# Altium PCB PCB_Control_Board_v2.5.PcbDoc (part 2 of 2)
Units mil, origin at the board's own origin, x right, y up, seen from the top; angles counter-clockwise.
Board outline 1338.58 x 1496.06 mil, 4 copper layers (Top Layer, GND, POWER, Bottom Layer), stack 61.811 mil thick; 74 components, 46 nets, 202 pads, 134 vias.
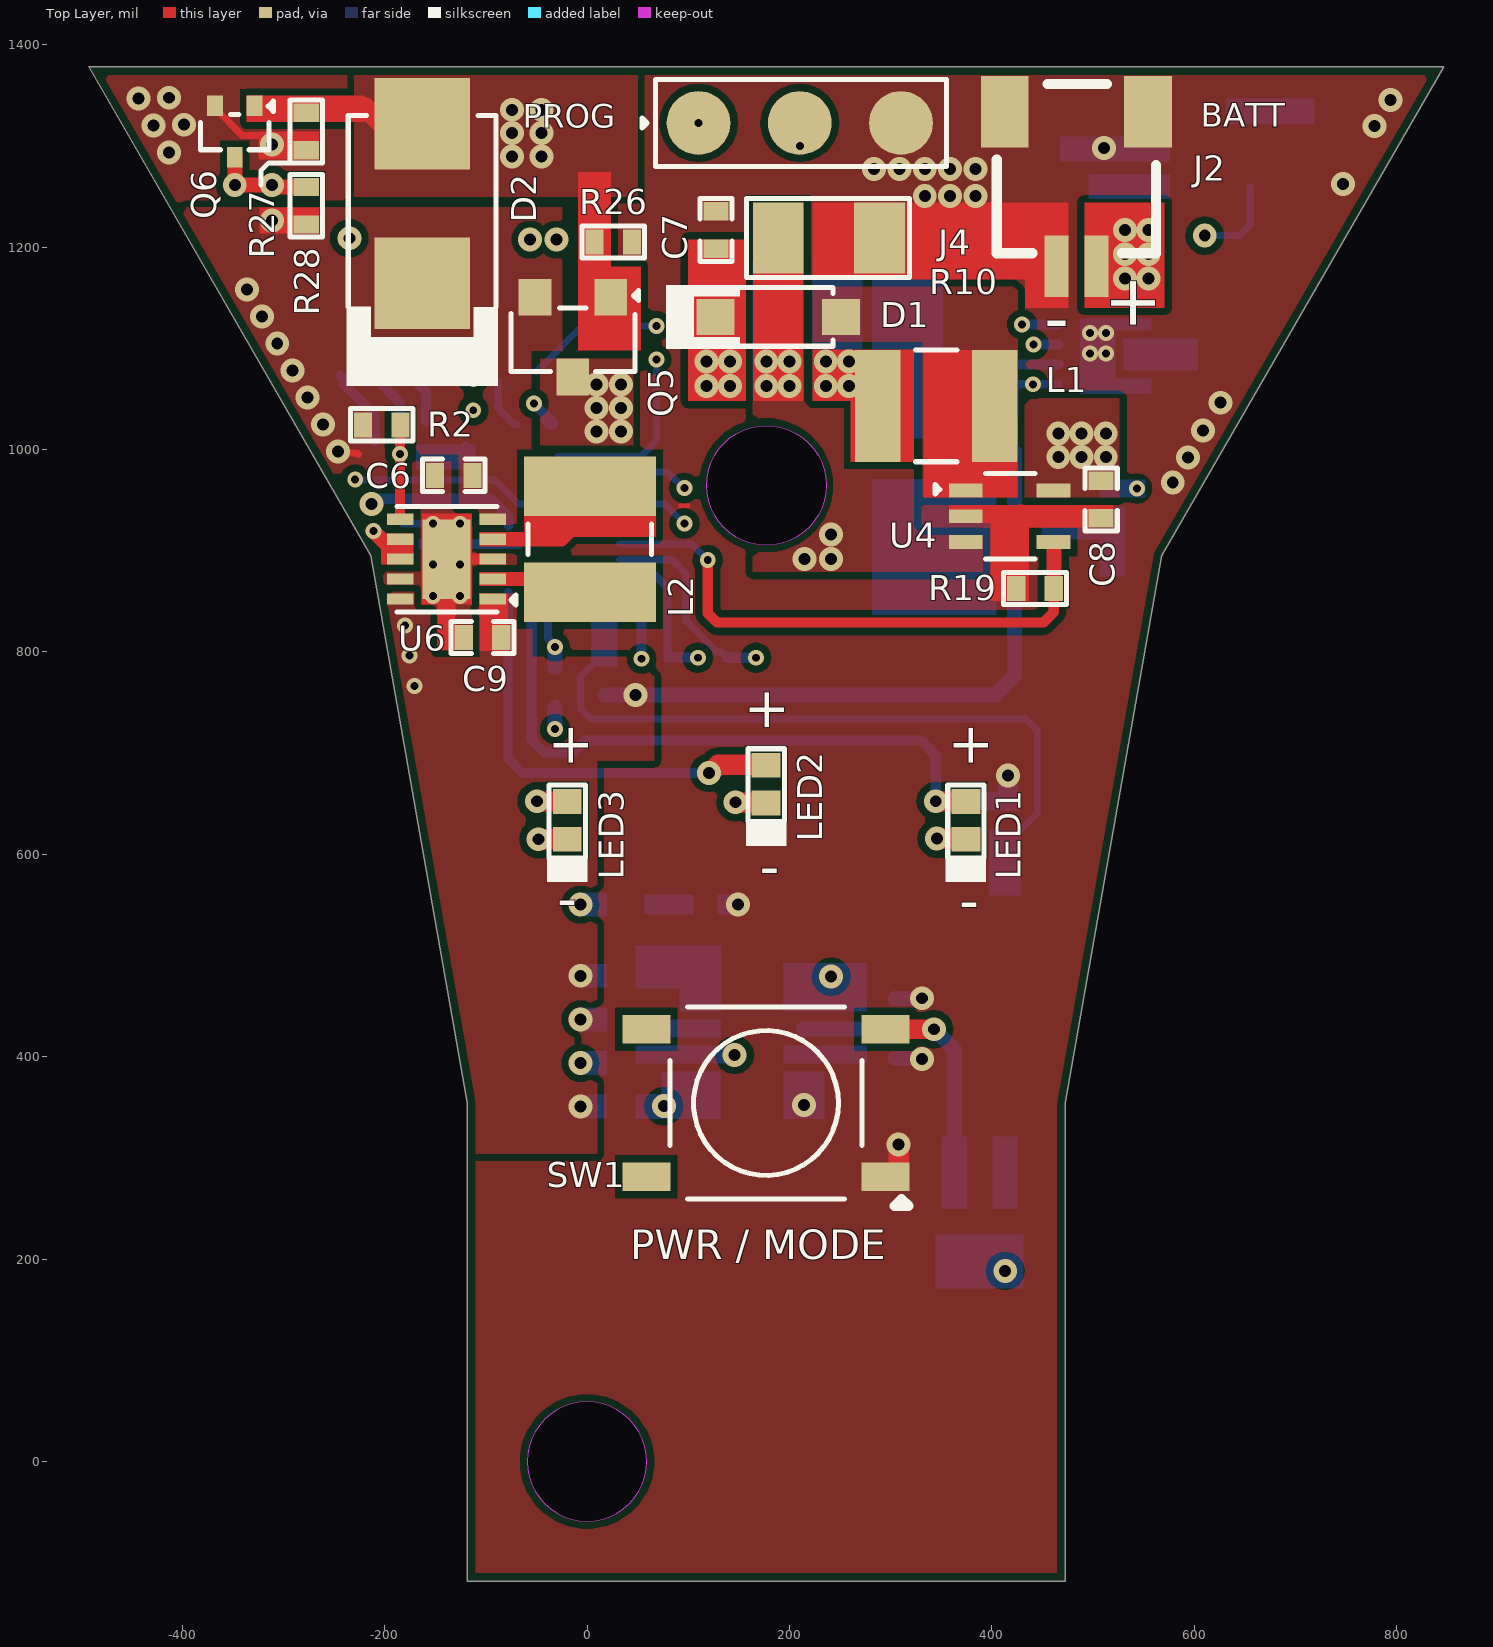
[diagram p0: Top Layer view]

## Part data (continued)
R21: library part RC0402FR-071KL, "RES 1K OHM 1% 1/16W 0402", Case Code (Imperial)=0402, Case Code (Metric)=1005, LCSC Part Number=C106235, Manufacturer=Yageo, Max Operating Temperature=155°C, Max Power Dissipation=63mW, Min Operating Temperature=-55°C, Power Rating=62.5mW, Resistance=1kR, Resistance Tolerance=1%, Resistor Type="Thick Film", Temperature Coefficient=100ppm/°C, Voltage Rating=50V, Case/Package=0402, Category="Chip SMD Resistors", ComponentLink1Description=https://datasheet.ciiva.com/11819/0900766b80c66297-11819477.pdf?src-supplier=RSComponents, ComponentLink1URL=https://datasheet.ciiva.com/11819/0900766b80c66297-11819477.pdf?src-supplier=RSComponents, ComponentLink2Description=https://datasheet.ciiva.com/7983/1018594-7983502.pdf?src-supplier=Element14, ComponentLink2URL=https://datasheet.ciiva.com/7983/1018594-7983502.pdf?src-supplier=Element14, ComponentLink3Description=https://datasheet.ciiva.com/22747/1018594-22747513.pdf?src-supplier=Element14, ComponentLink3URL=https://datasheet.ciiva.com/22747/1018594-22747513.pdf?src-supplier=Element14, ComponentLink4Description=https://datasheet.ciiva.com/12666/pyu-rc0402-51-rohs-l-6-r-12666741.pdf?src-supplier=Mouser, ComponentLink4URL=https://datasheet.ciiva.com/12666/pyu-rc0402-51-rohs-l-6-r-12666741.pdf?src-supplier=Mouser, ComponentLink5Description=https://datasheet.ciiva.com/7849/1018594-7849869.pdf?src-supplier=Element14, ComponentLink5URL=https://datasheet.ciiva.com/7849/1018594-7849869.pdf?src-supplier=Element14, ComponentLink6Description=https://datasheet.ciiva.com/7849/1018594-7849871.pdf?src-supplier=Element14, ComponentLink6URL=https://datasheet.ciiva.com/7849/1018594-7849871.pdf?src-supplier=Element14, ComponentLink7Description=https://datasheet.ciiva.com/17063/pyu-rc0402-51-rohs-l-6-r-17063193.pdf?src-supplier=Future+Electronics, ComponentLink7URL=https://datasheet.ciiva.com/17063/pyu-rc0402-51-rohs-l-6-r-17063193.pdf?src-supplier=Future+Electronics, Construction=Rectangular, Depth=0.5mm, Features="Moisture Resistant", Height=0.32mm, Item Type=Resistor, Lead Free="Lead Free", Length=1mm, Manufacturer Part Number=RC0402FR-071KL, Military Standard=Not, Number of Pins=2, Number of Terminations=2, Packaging="Tape and Reel", Pricing 1="10000=0.00085, 20000=0.00087, 40000=0.00084, 60000=0.00083, 80000=0.00079, 100000=0.00078, 1000000=0.00076 (USD)", Reach SVHC Compliant=Yes, RoHS=Yes, RoHS Compliant=Yes, Series=RC, Size Code=0402, Stock 1=13030000, Supplier 1=Avnet, Supplier Part Number 1=RC0402FR-071KL, Technology="THICK FILM", Termination=SMD/SMT, Tolerance=1%, Voltage Rating (DC)=50V, Width=0.5mm
R24 R25: library part RC0402FR-072K2L, "RES SMD 2.2K OHM 1% 1/16W 0402", Case Code (Imperial)=0402, Case Code (Metric)=1005, LCSC Part Number=C114762, Manufacturer=Yageo, Max Operating Temperature=155°C, Max Power Dissipation=63mW, Min Operating Temperature=-55°C, Resistance=2.2kR, Resistance Tolerance=1%, Resistor Type="Thick Film", Supplier Part Number 1=311-2.20KLRCT-ND, Temperature Coefficient=100ppm/°C, Voltage Rating=50V, Case/Package=0402, ComponentLink1Description=http://www.farnell.com/datasheets/2167052.pdf?src-supplier=Element14, ComponentLink1URL=http://www.farnell.com/datasheets/2167052.pdf?src-supplier=Element14, ComponentLink2Description=http://www.yageo.com/documents/recent/PYu-RC_Group_51_RoHS_L_9.pdf?src-supplier=Mouser, ComponentLink2URL=http://www.yageo.com/documents/recent/PYu-RC_Group_51_RoHS_L_9.pdf?src-supplier=Mouser, ComponentLink3Description=http://documents.rs-components.com/techlib://itc_doclist_GB.htm?stockno=6186532&src-supplier=RSComponents, ComponentLink3URL=http://documents.rs-components.com/techlib://itc_doclist_GB.htm?stockno=6186532&src-supplier=RSComponents, ComponentLink4Description=http://www.yageo.com/documents/recent/PYu-RC0402_51_RoHS_L_6_r.pdf?src-supplier=Future+Electronics, ComponentLink4URL=http://www.yageo.com/documents/recent/PYu-RC0402_51_RoHS_L_6_r.pdf?src-supplier=Future+Electronics, Construction=Rectangular, Depth=0.5mm, Features="Moisture Resistant", Height=0.35mm, Lead Free="Lead Free", Length=1mm, Manufacturer Part Number=RC0402FR-072K2L, Military Standard=Not, Number of Terminations=2, Packaging="Tape and Reel", Power Rating=63mW, Pricing 1="1=0.1, 10=0.016, 100=0.0066, 1000=0.00299, 2500=0.00259, 5000=0.00214 (USD)", REACH SVHC=Unknown, RoHS Compliant=Yes, Series=RC, Size Code=0402, Stock 1=966157, Supplier 1=Digi-Key, Technology="THICK FILM", Termination=SMD/SMT, Tolerance=1%, Weight=2.3E-05oz, Width=0.5mm
R27: library part RC0402FR-07100KL, "RES 100K OHM 1% 1/16W 0402", Case Code (Imperial)=0402, Case Code (Metric)=1005, LCSC Part Number=C60491, Manufacturer=Yageo, Max Operating Temperature=155°C, Max Power Dissipation=63mW, Min Operating Temperature=-55°C, Package Quantity=1, Resistance=100kR, Resistance Tolerance=1%, Resistor Type="Thick Film", Supplier Part Number 1=603-RC0402FR-07100KL, Temperature Coefficient=100ppm/°C, Voltage Rating=50V, Case/Package=0402, Category="Chip SMD Resistors", ComponentLink1Description=https://datasheet.ciiva.com/11819/0900766b80c66297-11819452.pdf?src-supplier=RSComponents, ComponentLink1URL=https://datasheet.ciiva.com/11819/0900766b80c66297-11819452.pdf?src-supplier=RSComponents, ComponentLink2Description=https://datasheet.ciiva.com/22747/1018594-22747509.pdf?src-supplier=Element14, ComponentLink2URL=https://datasheet.ciiva.com/22747/1018594-22747509.pdf?src-supplier=Element14, ComponentLink3Description=https://datasheet.ciiva.com/2453/pyu-r-int-thick-7-2453362.pdf?src-supplier=Digi-Key, ComponentLink3URL=https://datasheet.ciiva.com/2453/pyu-r-int-thick-7-2453362.pdf?src-supplier=Digi-Key, ComponentLink4Description=https://datasheet.ciiva.com/2453/pyu-r-int-thick-7-2453363.pdf?src-supplier=Digi-Key, ComponentLink4URL=https://datasheet.ciiva.com/2453/pyu-r-int-thick-7-2453363.pdf?src-supplier=Digi-Key, ComponentLink5Description=https://datasheet.ciiva.com/2453/pyu-r-int-thick-7-2453361.pdf?src-supplier=Digi-Key, ComponentLink5URL=https://datasheet.ciiva.com/2453/pyu-r-int-thick-7-2453361.pdf?src-supplier=Digi-Key, ComponentLink6Description=https://datasheet.ciiva.com/12667/pyu-rc0402-51-rohs-l-6-r-12667930.pdf?src-supplier=Mouser, ComponentLink6URL=https://datasheet.ciiva.com/12667/pyu-rc0402-51-rohs-l-6-r-12667930.pdf?src-supplier=Mouser, ComponentLink7Description=https://datasheet.ciiva.com/15189/getdatasheetpartid-323696-15189334.pdf?src-supplier=Verical, ComponentLink7URL=https://datasheet.ciiva.com/15189/getdatasheetpartid-323696-15189334.pdf?src-supplier=Verical, Construction=Rectangular, Depth=0.5mm, Features="Moisture Resistant", Height=0.016inch, Item Type=Resistor, Lead Free="Lead Free", Length=0.039inch, Manufacturer Part Number=RC0402FR-07100KL, Military Standard=Not, Number of Terminations=2, Packaging="Tape and Reel", Power Rating=63mW, Pricing 1="1=0.10000, 10=0.01200, 50=0.01200, 100=0.00500, 1000=0.00300, 2500=0.00200, 10000=0.00100 (USD)", REACH SVHC="No SVHC", RoHS=Yes, RoHS Compliant=Yes, Series=RC, Stock 1=7759549, Supplier 1=Mouser, Technology="THICK FILM", Termination=SMD/SMT, Tolerance=1%, Width=0.02inch, Working Voltage=50V
SB1: "Solder Bridge ON", Item Type="Solder Bridge", Manufacturer Part Number="Solder Bridge 0402"
SW1: "Tactile Switches 5.20 x 5.20 Tact Switch for SMT", LCSC Part Number=C2991193, Manufacturer="ITT C&K", Item Type=Switch, Manufacturer Part Number=PTS526SP15SMTR2LFS, Pricing="1=0.14, 10=0.135, 50=0.135, 100=0.12, 1000=0.12, 10000=0.102 (USD)", RoHS=No, Stock=8224, Supplier=Mouser
U2: "IC Pb On/off Controller TSOT23-8", Case/Package=SOT-23-8, LCSC Part Number=C683746, Manufacturer="Analog Devices / Linear Technology", Max Operating Temperature=85°C, Min Operating Temperature=-40°C, Operating Supply Current=6uA, Package Quantity=2500, Supplier Part Number 1=584-C2950ITS8-2TRPBF, Category="Integrated Circuits (ICs)", ComponentLink1Description=https://datasheet.ciiva.com/1967/7377-1967658.pdf?src-supplier=Digi-Key, ComponentLink1URL=https://datasheet.ciiva.com/1967/7377-1967658.pdf?src-supplier=Digi-Key, Item Type=IC, Length=2.9mm, Manufacturer Part Number=LTC2950ITS8-2#TRPBF, Number of Pins=8, Packaging="Tape and Reel", Pricing 1="1=6.42, 10=5.8, 50=5.53, 100=4.8, 1000=3.76, 10000=3.62 (USD)", RoHS=Yes, RoHS Compliant=Yes, Series=-, Stock 1=260, Supplier 1=Mouser
U3: "AVR tinyAVR™ 1, Functional Safety (FuSa) Microcontroller IC 8-Bit 20MHz 16KB (16K x 8) FLASH 20-VQFN (3x3)", Digikey Part Number=ATTINY1616-MNRDKR-ND, Manufacturer="Microchip Tech", Package=QFN-20-EP(3x3), ComponentLink1Description="Digikey Link", ComponentLink1URL=https://www.digikey.com/en/products/detail/microchip-technology/ATTINY1616-MNR/7354618?s=N4IgTCBcDaIIIBUEEkByBNAjANhwWgFlUAlEAXQF8g, Item Type=IC, Manufacturer Part Number=ATTINY1616-MNR
U4: "IC LED DRV RGLTR PWM 1.2A SC70-5", LCSC Part Number=C2928788, Manufacturer="Texas Instruments", Item Type=IC, Manufacturer Part Number=TPS92360DCKR, Pricing="1=0.91, 10=0.817, 25=0.7748, 100=0.6366, 250=0.59508, 500=0.52588, 1000=0.41517 (USD)", RoHS=No, Stock=4572, Supplier=Digikey
U5: "IC BATT MON LI-ION 1CELL 8TDFN", LCSC Part Number=C2682616, Manufacturer=Maxim, Max Operating Temperature=85°C, Min Operating Temperature=-20°C, Operating Supply Current=23uA, Operating Supply Voltage=4.5V, Output Voltage=400mV, Package Quantity=10000, Supplier Part Number 1=700-MAX17048G+T10, Category="Battery Management", ComponentLink1Description=https://datasheet.ciiva.com/14083/max17048-max17049-14083973.pdf?src-supplier=Digi-Key, ComponentLink1URL=https://datasheet.ciiva.com/14083/max17048-max17049-14083973.pdf?src-supplier=Digi-Key, Contact Plating=Tin,Matte, Item Type=IC, Manufacturer Part Number=MAX17048G+T10, Mount="Surface Mount", Number of Pins=8, Packaging="Tape and Reel", Pricing 1="1=3.34000, 10=3.00000, 50=2.84000, 100=2.46000, 1000=1.89000, 10000=1.83000 (USD)", Radiation Hardening=No, RoHS=Yes, RoHS Compliant=Yes, Series=ModelGauge™, Stock 1=41293, Supplier 1=Mouser
U6: "IC REG BUCK BST 3.3V 0.9A 10SON", LCSC Part Number=296-39461-1-ND, Manufacturer="Texas Instruments", ComponentLink1Description=https://datasheet.ciiva.com/2034/tps63030-2034702.pdf?src-supplier=Digikey, ComponentLink1URL=https://datasheet.ciiva.com/2034/tps63030-2034702.pdf?src-supplier=Digikey, ComponentLink2Description=https://datasheet.ciiva.com/3221/tps63030-3221513.pdf?src-supplier=Avnet, ComponentLink2URL=https://datasheet.ciiva.com/3221/tps63030-3221513.pdf?src-supplier=Avnet, Item Type=IC, Manufacturer Part Number=TPS63031DSKR, Pricing="1=2.06, 10=1.847, 25=1.7424, 100=1.4844, 250=1.3938, 500=1.21958, 1000=1.0105 (USD)", RoHS=Yes, Stock=6304, Supplier=Digikey
U7: "OPTOISOLATOR 3.75KV TRANS 4-SOP", LCSC Part Number=C81148, Manufacturer="Vishay Semiconductors", Voltage Rating (DC)=70V, ComponentLink1Description=https://datasheet.ciiva.com/11772/0900766b80e30939-11772485.pdf?src-supplier=Rs, ComponentLink1URL=https://datasheet.ciiva.com/11772/0900766b80e30939-11772485.pdf?src-supplier=Rs, ComponentLink2Description=https://datasheet.ciiva.com/27051/1107109-27051440.pdf?src-supplier=Jameco, ComponentLink2URL=https://datasheet.ciiva.com/27051/1107109-27051440.pdf?src-supplier=Jameco, ComponentLink3Description=https://datasheet.ciiva.com/8040/485045-8040879.pdf?src-supplier=Element14, ComponentLink3URL=https://datasheet.ciiva.com/8040/485045-8040879.pdf?src-supplier=Element14, ComponentLink4Description=https://datasheet.ciiva.com/14079/tcmt1100-14079945.pdf?src-supplier=Digikey, ComponentLink4URL=https://datasheet.ciiva.com/14079/tcmt1100-14079945.pdf?src-supplier=Digikey, ComponentLink5Description=https://datasheet.ciiva.com/14079/tcmt1100-14079946.pdf?src-supplier=Digikey, ComponentLink5URL=https://datasheet.ciiva.com/14079/tcmt1100-14079946.pdf?src-supplier=Digikey, ComponentLink6Description=https://datasheet.ciiva.com/8092/tcmt1100-8092285.pdf?src-supplier=Avnet, ComponentLink6URL=https://datasheet.ciiva.com/8092/tcmt1100-8092285.pdf?src-supplier=Avnet, ComponentLink7Description=https://datasheet.ciiva.com/12088/tcmt1100-103040-12088638.pdf?src-supplier=Mouser, ComponentLink7URL=https://datasheet.ciiva.com/12088/tcmt1100-103040-12088638.pdf?src-supplier=Mouser, Height=2.3mm, Item Type=Optocouplers, Lead Free=5697LeadFree, Manufacturer Part Number=TCMT1107, Pricing="1=0.6, 10=0.386, 50=0.386, 100=0.26, 1000=0.203, 10000=0.163 (USD)", RoHS=Yes, RoHS Compliant=5897YesNo, Stock=27846, Supplier=Mouser, Turn-Off Delay Time=4us, Turn-On Delay Time=1.5us
U8: "IC BAT CHG LI-ION 1 CELL SOT23-6", Battery Pack Voltage=4.2V, Case/Package=SOT-23-6, LCSC Part Number=C202311, Manufacturer="Texas Instruments", Max Charge Current=800mA, Max Operating Temperature=125°C, Max Supply Voltage=6.45V, Min Operating Temperature=0°C, Supplier Part Number 1=296-47315-1-ND, ComponentLink1Description=http://www.ti.com/lit/ds/symlink/bq21040.pdf?src-supplier=Digi-Key, ComponentLink1URL=http://www.ti.com/lit/ds/symlink/bq21040.pdf?src-supplier=Digi-Key, ComponentLink2Description=http://www.ti.com/general/docs/suppproductinfo.tsp?distId=10&gotoUrl=http%3A%2F%2Fwww.ti.com%2Flit%2Fgpn%2Fbq21040&src-supplier=Digi-Key, ComponentLink2URL=http://www.ti.com/general/docs/suppproductinfo.tsp?distId=10&gotoUrl=http%3A%2F%2Fwww.ti.com%2Flit%2Fgpn%2Fbq21040&src-supplier=Digi-Key, ComponentLink3Description=http://www.ti.com/general/docs/suppproductinfo.tsp?distId=10&amp;gotoUrl=http%3A%2F%2Fwww.ti.com%2Flit%2Fgpn%2Fbq21040&src-supplier=Digi-Key, ComponentLink3URL=http://www.ti.com/general/docs/suppproductinfo.tsp?distId=10&amp;gotoUrl=http%3A%2F%2Fwww.ti.com%2Flit%2Fgpn%2Fbq21040&src-supplier=Digi-Key, Differential Output=No, Fault Protection="Over Voltage,Over Temperature,Short Circuit", Interface=USB,SPI, Item Type=IC, Lead Free="Lead Free", Manufacturer Part Number=BQ21040DBVR, Mount="Surface Mount", Number of Bits=16, Number of Cells=1, Number of D/A Converters=4, Output Type="Analog Current/Voltage", Packaging="Cut Tape", Pricing 1="1=1.14, 10=1.015, 100=0.7396, 500=0.61924, 1000=0.48163 (USD)", Settling Time=30us, Stock 1=5958, Supplier 1=Digi-Key

## Via types
v1: diameter 23.62, hole 11.81, Top Layer to Bottom Layer, tented both sides, 99 vias
v2: diameter 15.75, hole 7.87, Top Layer to Bottom Layer, tented both sides, 35 vias

## Nets (pads, with @x,y where several pads share a name; then routed paths per layer and width w, separated by ;. In a path a pad name is that pad's centre, name@x,y a point inside that pad or via, vN(x,y) a via of type N, cw(c..) or ccw(c..) an arc to the next point about the centre after c; other vN are vias at no path point)
25%: LED3.1 U3.5 | length 620.6
  Top Layer w20: v1@-47.83,652.24 LED3.1
  POWER w10: v1(-213.11,946.12) -212.17,947.06 -87.22,947.06 -49.42,909.25 v1(-49.42,652.39)
  Bottom Layer w10: v1@-209.42,946.12 v1@-206.82,948.72 ; v1@-208.44,951.3 -95.3,951.3 -77.52,933.52 U3.5@-77.52,924.79 ; v1@-205.02,946.72 -201.48,950.26
50%: LED2.1 U3.1 | length 427.2
  Top Layer w20: v1(120.58,680.4) 121.56,680.4 129.52,688.37 LED2.1@176.57,688.37
  Bottom Layer w10: U3.1@-77.96,858.11 -77.96,694.55 -63.81,680.4 v1(120.58,680.4)
75%: LED1.1 U3.20 | length 618.3
  Top Layer w20: v1@346.17,652.24 LED1.1
  Bottom Layer w7: U3.20@-54.33,827.02 U3.20
  Bottom Layer w10: U3.20@-54.59,833.42 -54.59,827.02 -54.59,713.06 -41.96,700.43 -14.13,700.43 -2.28,712.28 330.2,712.28 344.58,697.9 v1(344.58,652.39)
BATT_CHG: R1.1 U3.7 U8.3 | length 895.2
  POWER w10: v2@73.88,1093.33 121.92,1141.37 594.55,1141.37 610.39,1157.21 v1(610.39,1211.32)
  Bottom Layer w7: R1.1 -28.51,993.1 53.55,993.1 68.73,1008.28 v2(68.73,1088.75) ; v1(610.39,1211.32) 644.68,1211.32 655.34,1221.98 U8.3
CTRL_SIG: R19.2 U3.12 U4.4 | length 565
  Top Layer w10: v2(119.3,890.78) 119.3,838.13 128.54,828.89 450.76,828.89 461.14,839.27 R19.2@461.14,866.63 ; U4.4 U4.4@461.14,908.11
  Top Layer w15: R19.2@461.32,866.81 U4.4@461.32,907.81
  Bottom Layer w7: U3.12 103.33,906.75 v2(119.3,890.78)
GND: C1.1 C2.1 C3.1 C4.1 C6.2 C7.1 C8.1 C9.2 C10.1 C12.1 C13.1 C14.1 C15.1 J2.2 J2.3 J2.4 J4.3 P5.1 P8.1 Q1.2 Q2.2 Q4.2 Q6.2 R3.1 R7.1 R8.2 R10.1 R12.2 R14.2 R15.2 R19.1 R26.1 R27.2 R30.2 SW1.1 U2.4 U3.3 U3.21 U4.2 U5.1 U5.4 U5.9 U6.3 U6.9 U6.11 U7.3 U8.5 | length 281.9
  Top Layer w7: Q6.2 -367.72,1337.35 -340.72,1310.35 -319.99,1310.35 v1(-311.18,1301.5)
  Top Layer w15: v1(-311.18,1301.5) -308.85,1301.5 -303.78,1296.43 -278.4,1296.43 R27.2
  Top Layer w20: SW1.1 297.24,281.46 307.92,292.13 v1(307.92,313.35)
  Bottom Layer w7: C2.1@-182.5,926.62 v2@-157.59,926.62 ; v2@-157.71,926.74 v2@-157.59,926.62 ; v2(-125.43,926.62) v2(-152.19,926.62) v2@-157.59,926.62 ; C12.1 C12.1@304.86,457.75
  Bottom Layer w15: C13.1 v1@331,398.2 ; C12.1 v1@331,457.39
  Bottom Layer w20: C15.1@416,655.06 v1(416,677.89)
  other v1: 214.24,352.45 331.12,397.77 -6.45,436.85 331.12,457.75 149.19,550.39 578.76,967.31 593.79,991.94 608.82,1018.57 625.85,1046.2 -56.17,1207.4 -30,1207.4 -234.87,1208.71 333.76,1250.54 358.87,1250.54 383.97,1250.54 747.01,1262.4 283.55,1277 308.65,1277 333.76,1277 358.87,1277 383.97,1277 -413.16,1293.43 510.86,1297.74 778.07,1319.66 -428.19,1320.06 -398.13,1320.87 794.1,1345.29 -443.22,1346.69 -413.16,1347.5
  other v2: -152.19,855.28 -125.43,855.28 -152.19,886.45 -125.43,886.45 -112.4,1038.75 497,1095 513,1095 497,1115 513,1115
GPOUT: R5.2 U3.6 U5.5 | length 1200.7
  POWER w10: v2(-229.02,970.51) -86.63,970.51 51.05,832.82 418.52,832.82 440.85,855.15 v2(440.85,1064.41)
  Bottom Layer w7: v2(-229.02,970.51) -228.34,969.83 -91.54,969.83 -67.83,946.12 U3.6
  Bottom Layer w8: R5.2 422.42,1059.72 427.1,1064.41 v2(440.85,1064.41) U5.5
LDO_EN: R2.2 SB1.1 U6.6 | length 180.7
  Top Layer w7: U6.6@-184.95,931.63 U6.6 ; v2(-184.95,995.45) v2@-184.65,995.75 ; R2.2@-184.65,1023.96 R2.2
  Top Layer w10: U6.6@-184.95,931.63 v2(-184.95,995.45) ; v2@-184.65,995.75 R2.2@-184.65,1023.96
  Bottom Layer w10: SB1.1 -203.17,1069.12 -203.17,1064.73 -184.95,1046.51 v2(-184.95,995.45)
LED_R_NEG: P1.1 R16.2
LED_W_NEG: P3.1 R10.2 U4.3
  other v1: 215.02,891.93 241.12,891.93 241.12,916.03 177.14,1062.85 200.25,1062.85 177.14,1086.96 200.25,1086.96
LED_W_POS: C7.2 D1.2 P4.1 | length 38
  Bottom Layer w12: 129.13,1111 129.27,1111.14 ; P4.1@129.27,1148.75 P4.1@129.41,1148.89
  Bottom Layer w20: 129.27,1111.14 P4.1@129.27,1148.75
  other v1: 118.15,1062.78 141.26,1062.78 118.15,1086.89 141.26,1086.89
M_BUTTON: C15.2 R13.1 U3.16 U7.4 | length 672.9
  Bottom Layer w7: R13.1@8.66,796.99 10.97,799.3 R13.1@10.97,800.18 ; 8.66,814.69 8.66,800.18 7.24,798.76 7.24,788.87 -6.44,775.19 -6.44,743.85 3.72,733.69 433.32,733.69 445,722.01 445,640.64 416,611.64 416,602.89
NetC13_2: C13.2 U2.3
NetC14_2: C14.2 U2.7
NetD1_1: D1.1 L1.2 U4.1
NetL2_1: L2.1 U6.4 | length 141.2
  Top Layer w14: U6.4 -25.32,911.29 -15.37,921.24 -15.37,941.04 -11.53,944.88 L2.1@22.53,944.88
NetL2_2: L2.2 U6.2 | length 59.5
  Top Layer w14: U6.2@-92.6,871.92 -45.9,871.92 L2.2@-36.82,862.84
NetLED1_2: LED1.2 R8.1 | length 29.1
  Top Layer w7: LED1.2@373.86,615.4 LED1.2
  Top Layer w20: v1(345.6,615.4) LED1.2@373.86,615.4
NetLED2_2: LED2.2 R14.1 | length 28.3
  Top Layer w20: v1@148.34,651.1 LED2.2@176.6,651.1
  other v1: 146.85,651.4
NetLED3_2: LED3.2 R15.1 | length 28.3
  Top Layer w20: v1(-47.83,614.83) LED3.2
NetQ1_1: Q1.1 R11.2 R12.1
NetQ1_3: Q1.3 R16.1
NetQ2_1: Q2.1 R21.1
NetQ2_3: Q2.3 R20.2 U2.8
NetQ3_1: Q3.1 R24.1 | length 51.1
  Bottom Layer w10: R24.1 -172.3,1069.62 -168.3,1065.62 -168.08,1065.62 -159.24,1056.78 -159.24,1030.56 -159.05,1030.36 Q3.1
NetQ3_2: Q3.2 Q4.3 | length 45.8
  Bottom Layer w7: Q3.2 -140.08,988.31 -127.77,1000.63 -124.5,1000.63 Q4.3
NetQ3_3: Q3.3 SB1.2 | length 79.3
  Bottom Layer w10: SB1.2 -240.17,1069.12 -240.17,1064.4 -209.83,1034.06 Q3.3
NetQ4_1: Q4.1 R25.1 | length 51.3
  Bottom Layer w7: R25.1@-87.67,1067.12 -87.67,1040.85 -71.51,1024.69 Q4.1
NetR3_2: R3.2 U8.4
NetR4_1: R4.1 U3.19 | length 54.3
  Bottom Layer w7: R4.1@-31.55,784.53 R4.1@-31.51,784.49 ; v2(-31.55,804.99) v2@-31.55,806.1
  Bottom Layer w8: U3.19 -38.59,813.13 v2@-31.55,806.1
  Bottom Layer w15: R4.1@-31.55,784.53 v2(-31.55,804.99)
NetR6_2: R6.2 U7.1
NetR7_2: R7.2 U5.6 | length 71.5
  Bottom Layer w7: R7.2 R7.2@394.41,1084.33
  Bottom Layer w10: R7.2@394.65,1084.09 U5.6
NetR30_1: R30.1 U8.1
P_BUTTON: R18.2 SW1.3 U2.2 U7.2 | length 251.4
  Bottom Layer w15: U2.2 214.52,427.46 342.44,427.46 v1(342.78,427.13) 363,406.91 U7.2
PUSH_CON: R9.1 R25.2 U2.6 | length 1572.3
  GND w7: v2(68.73,1121.88) 69.33,1122.48 281.41,1122.48 293,1110.88 293,860 283.82,850.82 -20.64,850.82 -59.31,812.15 -59.31,719.51 -41.39,701.59 66.6,701.59 90.64,677.55 90.64,416.07 105.05,401.66 v1(145.83,401.66)
  Bottom Layer w7: R25.2@-49.76,1077 -49.76,1077.52 -45.17,1082.12 -44.64,1082.12 -4.88,1121.88 v2(68.73,1121.88)
RED_LED: R11.1 U3.15 | length 736.6
  GND w7: v2(53.98,793.2) 88.79,758.39 341.95,758.39 389.03,805.47 389.03,943.97 406.56,961.51 v2@541.36,961.51
  Bottom Layer w10: U3.15@42.78,858.08 53.98,846.88 v2(53.98,793.2)
  other v2: 543.36,961.51
SCL: R23.2 U3.14 U5.7 | length 810.8
  GND w7: v2(109.47,794.19) 128.26,775.39 333.45,775.39 370.66,812.61 370.66,1087.91 386.53,1103.78 v2(441.19,1103.78)
  Bottom Layer w8: U3.14 68.07,875.25 79.47,863.85 R23.2@79.47,793.2
  Bottom Layer w10: R23.2 v2@109.16,794.49 ; v2(441.19,1103.78) U5.7
SDA: R22.2 U3.13 U5.8 | length 797.9
  GND w7: v2(167.02,794.19) 322.13,794.19 351.56,823.62 351.56,1098.56 376.5,1123.5 v2(429.85,1123.5)
  Bottom Layer w7: U3.13 84.16,891 97.59,877.57 97.59,831.11 128.71,799.99 132.46,799.99 R22.2
  Bottom Layer w10: R22.2@138.27,794.19 v2(167.02,794.19) ; v2(429.85,1123.5) U5.8
U_INT: R17.2 U2.5 U3.10 | length 901.1
  GND w7: v1(75.91,351.14) 75.91,670.89 60.22,686.58 -46.18,686.58 -73.31,713.71 -73.31,817.95 35.62,926.87 v2(96.19,926.87)
  Bottom Layer w7: U3.10 76.95,946.12 v2(96.19,926.87)
U_KILL: R21.2 U3.9 | length 713.1
  GND w7: v1@-1.45,550.34 -46.72,550.34 -87.31,590.92 -87.31,823.74 50.77,961.82 v2(96.16,961.82)
  Bottom Layer w7: U3.9 -7.09,970.3 0.17,977.56 79.65,977.56 95.39,961.82 v2(96.16,961.82)
  other v1: -6.45,550.34
UPDI: J4.2 R4.2 | length 961.9
  GND w7: v2(-31.55,723.67) -8.18,723.67 3.58,735.43 3.58,824.05 14.76,835.23 295.56,835.23 312.56,852.23 312.56,1137.44 210.24,1239.76 v2(210.24,1299.66) v2@210.24,1300.66
  Bottom Layer w15: v2(-31.55,723.67) v2(-31.55,723.67) R4.2
VBAT: C4.2 C10.2 J2.1 Q5.3 U5.2 U5.3 U8.2
  other v1: 9.34,1017.81 33.45,1017.81 9.34,1040.92 33.45,1040.92 9.34,1064.02 33.45,1064.02 531.63,1168.82 554.73,1168.82 531.63,1192.93 554.73,1192.93 531.63,1217.04 554.73,1217.04
VBATT: C6.1 C8.2 C12.2 D2.2 L1.1 P2.1 Q5.2 R2.1 R6.1 R9.2 R18.1 R28.1 U2.1 U4.5 U6.5 U6.7 U6.8 | length 60.5
  Top Layer w7: v1(-245.94,998.1) -244.52,996.68 -227.1,996.68 -225.68,995.26 ; U6.8@-185.35,893.69 U6.8@-182.81,893.69
  Top Layer w15: v2(-211.16,919.5) U6.8@-185.35,893.69
  other v1: 413.23,188.25 -6.45,393.75 241.18,479.05 465.66,992.61 488.49,992.61 512.6,992.61 465.66,1015.72 488.49,1015.72 512.6,1015.72 -260.97,1024.73 -276,1051.36 235.92,1062.85 259.03,1062.85 -291.03,1077.98 235.92,1086.96 259.03,1086.96 -306.06,1104.61 -321.09,1131.24 -336.12,1157.87 -311.18,1226.33
VBUS_IND: Q6.3 R24.2 R28.2 | length 476
  Top Layer w15: v1(-348.04,1261.4) -315.51,1261.4 -313.51,1263.4 v1@-311.18,1263.4 ; v1@-347.91,1263.4 Q6.3@-347.91,1290.15 ; v1(-311.18,1261.4) -308.85,1261.4 -306.78,1259.33 R28.2
  GND w15: v1(-311.18,1261.4) -183.37,1261.4 -112.4,1190.43 v2@-112.4,1066.8
  Bottom Layer w15: R24.2 -135.3,1071.44 -133.8,1069.94 -112.54,1069.94 v2(-112.4,1069.8)
VCC_3V3: C1.2 C2.2 C9.1 J4.1 R1.2 R5.1 R13.2 R17.1 R20.1 R22.1 R23.1 U3.4 U6.1 U6.10 | length 2302.2
  GND w10: v2(-52.54,1045.44) -52.54,880.43 -103.31,829.66 -103.31,576.81 v1(-6.45,479.94) ; v1(48.02,757.49) 31.61,773.91 31.61,804.3 44.29,816.99 305.7,816.99 331.5,842.79 331.5,1149.62 235.58,1245.54 235.58,1306.2 219.12,1322.66 v2(110.24,1322.66)
  Bottom Layer w10: v2(-52.54,1045.44) R1.2@-32.87,1025.77 ; R1.2@-41.16,1028.94 -37.16,1024.94 R1.2
  Bottom Layer w15: R13.2 v1(48.02,757.49) 79.39,757.49 106.96,757.49 R22.1 403.6,757.49 422.42,776.31 R5.1
  other v1: -6.45,350.7
  other v2: -170.55,766.43 -175.4,796.58 -179.67,826.09
VUSB: C3.2 D2.1 P6.1 P7.1 Q5.1 Q6.1 R26.2 R27.1 U8.6 | length 171.1
  Top Layer w15: Q6.1 -287.9,1339.51 -281.01,1332.62 R27.1 ; R27.1@-277.51,1338.5 -219.84,1338.5
  Top Layer w20: -219.84,1338.5 -182.6,1301.26 D2.1@-182.6,1294.21
  other v1: -74.01,1289.41 -44.9,1289.41 -74.01,1312.52 -44.9,1312.52 -74.01,1335.62 -44.9,1335.62
pads on no net: SW1.2 SW1.4 U3.2 U3.8 U3.11 U3.17 U3.18

## Polygon pours and split planes (outlines as drawn)
VBAT on Bottom Layer "VBAT_L04_P021" (solid, pour order 21): 639.25,1078.19 720.39,1218.37 720.39,1309.09 584.8,1309.09 584.8,1241.69 580.35,1237.24 460.56,1237.24 460.56,1136.59 565.85,1136.59 565.85,1107.68 532,1107.68 530,1109.69 530,1078.19
VUSB on Bottom Layer "VUSB_L04_P023" (solid, pour order 23): 576.96,1315.86 256.83,1315.86 256.83,1258 -73.92,1258 -87.09,1244.83 -87.09,1115.77 -200.77,1115.77 -200.77,1377.95 576.96,1377.95
LED_W_NEG on Bottom Layer "LED_W_NEG_L04_P029" (solid, pour order 29): 274.06,1040.86 274.06,879.13 164,879.13 164,1089.74 214,1089.74 214,1048 221.14,1040.86 253.59,1040.86
VCC_3V3 on Bottom Layer "VCC_3V3_L04_P010" (solid, pour order 10): -144.52,878.4 -144.52,753.13 -200.61,753.13 -200.61,911.67 -64.18,911.67 -64.18,901.83 -121.09,901.83
GND on Bottom Layer "GND_L04_P027" (solid, remove dead copper, pour order 27): -492.11,1377.89 845.89,1377.89 837.89,1363.89 817.89,1328.89 799.89,1296.89 763.89,1234.89 738.89,1191.89 701.89,1126.89 610.89,968.89 567.89,895.89 545.89,773.89 492.89,472.89 472.89,354.89 472.89,-118.11 -118.11,-118.11 -118.11,354.89 -120.11,369.89 -136.11,457.89 -158.11,581.89 -197.11,802.89 -213.11,894.89 -237.11,936.89 -264.11,983.89
NetD1_1 on Top Layer "NETD1_1_L01_P031" (solid, pour order 31): 223.04,1106.41 331.5,1106.41 331.5,953.72 332.51,952.71 425.41,952.71 425.41,1156.58 421,1161 223.04,1161
VBATT on Top Layer "VBATT_L01_P011" (solid, pour order 11): 432.45,952.71 432.45,1050.63 526,1050.63 526,952.71
VUSB on Top Layer "VUSB_L01_P022" (solid, pour order 22): -229.84,1249.69 -229.84,1369.8 50,1369.8 50,1249.69
VCC_3V3 on Top Layer "VCC_3V3_L01_P024" (solid, pour order 24): -54.1,794.99 66.51,794.99 66.51,692.39 10,692.39 10,304 -113.93,304 -118.11,308.18 -118.11,354.33 -211.87,886.09 -54.1,886.09
LED_W_NEG on Top Layer "LED_W_NEG_L01_P025" (solid, pour order 25): 323.06,980.69 323.06,923.48 331.23,915.31 390.95,915.31 390.95,879.13 164,879.13 164,1089.74 214,1089.74 214,1048 221.14,1040.86 253.59,1040.86 253.59,980.69
VBATT on Top Layer "VBATT_L01_P026" (solid, pour order 26): -24.62,1239.1 -24.62,1097.74 -54.85,1097.74 -54.85,925.46 -126.78,925.46 -126.78,995.45 -166.58,995.45 -166.58,925.46 -230.39,925.46 -411.81,1239.1
GND on Top Layer "GND_L01_P028" (solid, remove dead copper, pour order 28): 541.81,750.69 567.84,895.38 646.11,1042.44 741.24,1195.89 799.89,1296.89 817.89,1328.89 845.89,1377.89 -492.11,1377.89 -264.11,983.89 -237.11,936.89 -213.11,894.89 -197.11,802.89 -158.11,581.89 -136.11,457.89 -120.11,369.89 -118.11,354.89 -118.11,-118.11 472.89,-118.11 472.89,354.89 492.89,472.89
VBAT on Top Layer "VBAT_L01_P030" (solid, pour order 30): -46.14,1089.74 45.65,1089.74 45.65,1004 -46.14,1004
VBAT on POWER "VBAT_L03_P018" (solid, pour order 18): 545.77,1230.69 567.57,1230.69 576.96,1221.3 576.96,1167.71 565.95,1156.69 552.91,1156.69 82.83,1156.69 ccw(c82.83,1125.45) 51.59,1125.45 51.59,1049.47 51.59,1019.05 cw(c37.5,1018.09) 38.45,1004 -22.46,1004 cw(c-22.46,1016.33) -34.79,1016.34 -34.79,1018.72 cw(c-24.14,1019.01) -34.79,1019.05 -34.79,1155.17 cw(c0.74,1155.17) -24.38,1180.3 9.05,1213.73 cw(c50,1172.8) 50,1230.69 64.67,1230.69
VBATT on POWER "VBATT_L03_P019" (solid, remove dead copper, pour order 19): -118.11,-118.11 -118.11,354.33 -213.51,895.38 -492.13,1377.95 846.46,1377.95 567.84,895.38 472.44,354.33 472.44,-118.11
GND on GND "GND_L02_P017" (solid, remove dead copper, pour order 17): -118.11,-118.11 -118.11,354.33 -213.51,895.38 -492.13,1377.95 846.46,1377.95 567.84,895.38 472.44,354.33 472.44,-118.11

## Other copper
Top Layer:
  rectangle net GND: 90.35,941.96 101.85,946.49
  rectangle net VUSB: -8.74,1097.74 53.34,1181.01
  rectangle net NetL2_1: -62.24,913.65 68.2,946.12
  rectangle net NetL2_2: -106.24,864.9 -93.15,878.92
  rectangle net NetL2_1: -106.24,904.27 -93.15,918.29
  rectangle net GND: -324.7,1286.62 -265.01,1314.36
  rectangle net VUSB: -336.23,1323.62 -219.84,1349.55
  rectangle net VBATT: -323.76,1213.33 -265.01,1239.1
  rectangle net NetD1_1: 332.51,952.71 425.41,1098.32
  rectangle net VUSB: -8.74,1132.26 53.34,1181.01
  region net VCC_3V3: -106.24,857.74 -106.24,801.09 -77.96,801.09 -77.96,857.74
  region net GND: -138.72,897.11 -138.72,886.09 -80.06,886.09 -80.06,897.11
  region net VBATT: -203.4,916.8 -203.4,886.09 -171.2,886.09 -171.2,916.8
  rectangle net GND: -163.72,846.72 -113.72,936.48
  rectangle net GND: -147.76,801.69 -129.76,862.84
  rectangle net VBATT: 260.59,987.69 323.06,1099
  rectangle net VBAT: 491.46,1140 570.84,1244
  rectangle net VUSB: -8.74,1132.26 23.54,1274.1
  rectangle net GND: 223.04,1168 475.71,1244
  rectangle net VBATT: 223.04,1048 316.56,1099
  rectangle net LED_W_POS: 100,1048 157,1207.4
  rectangle net GND: 398.59,922.97 520.45,944.97
  rectangle net GND: 398.59,850.13 436.59,944.97
  rectangle net GND: 357.48,927.12 436.58,944.97
  rectangle net GND: 433,1140 475.71,1238
  rectangle net LED_W_NEG: 164,1048 214,1238
  region net P_BUTTON: 342.78,436.57 294.88,436.57 294.88,417.5 342.78,417.5
  region net VBATT: -171.2,916.8 -203.4,916.8
Bottom Layer:
  rectangle net NetQ3_2: -169.08,980.44 -110.09,1005
  rectangle net GND: 467.12,1284.69 576.2,1309.09
  rectangle net NetR30_1: 631.32,1321.79 718.89,1346.79
  rectangle net NetR3_2: 495.62,1247.28 576.2,1271.99
  region net BATT_CHG: -33.66,987.94 -43.51,987.94 -43.51,946.12 -33.66,946.12
  rectangle net VCC_3V3: -166.71,901.83 -64.18,911.67
  region net U_KILL: 19.72,562.15 -6.45,562.15 -6.45,538.52 19.72,538.52
  rectangle net RED_LED: 506.36,952.51 552,970.51
  rectangle net GND: 373.89,643.39 428.5,661.39
  rectangle net M_BUTTON: 397.25,559.03 428.75,624.39
  rectangle net NetQ1_1: 449.07,911.15 531.36,943.43
  rectangle net NetQ1_1: 506.36,874.57 531.36,927.51
  rectangle net VBATT: 193.51,444.53 276.5,492.5
  rectangle net U_INT: 73.81,338.26 132.49,385.47
  rectangle net U_INT: 47.72,338.26 132.49,363.26
  rectangle net PUSH_CON: 47.72,393.35 138.11,411.06
  region net NetLED3_2: -46.96,623.83 -46.96,605.83 -11.61,605.83 -11.61,623.83
  region net NetLED2_2: 146.85,660.39 146.85,642.39 184.39,642.39 184.39,660.39
  rectangle net 75%: -59.79,822.1 -54.33,849.66
  rectangle net M_BUTTON: 3.74,785.49 30.16,835.88
  rectangle net NetQ1_3: 281.56,836.34 404.55,970.7
  rectangle net GND: 487.12,1054.6 522.12,1129.37
  rectangle net GND: 489.05,1054.6 557.56,1070.27
  rectangle net GND: 489.06,1117.56 557.56,1129.37
  rectangle net VBAT: 530,1078.19 603.76,1109.69
  rectangle net LED_W_POS: 104.58,1051 154.57,1186.61
  rectangle net LED_W_NEG: 163.57,1051.07 213.55,1186.61
  rectangle net VBATT: 222.35,1051.07 272.34,1186.61
  rectangle net LED_R_NEG: 281.56,1010.7 351.56,1186.61
  region net NetLED1_2: 346.04,624.39 346.04,606.39 381.39,606.39 381.39,624.39
  rectangle net GND: 128.81,540.35 153.72,560.43
  rectangle net NetQ2_1: 56.72,540.35 105.19,560.43
  rectangle net VBATT: 344.1,171 431.16,224.5
  rectangle net GND: 193.51,338.26 234.85,385.47
  region net VCC_3V3: 19.72,362.51 -6.45,362.51 -6.45,338.88 19.72,338.88
  region net VCC_3V3: 19.72,491.76 -6.45,491.76 -6.45,468.13 19.72,468.13
  region net VBATT: 19.72,405.56 -6.45,405.56 -6.45,381.93 19.72,381.93
  region net GND: 19.72,448.66 -6.45,448.66 -6.45,425.03 19.72,425.03
  rectangle net GND: 304.5,457.39 325.66,457.44
  rectangle net NetR6_2: 400.5,249.5 425.5,321
  rectangle net P_BUTTON: 350.5,249.5 375.5,321
  rectangle net NetC13_2: 193.51,393.35 276.5,411.06
  rectangle net NetQ2_3: 47.72,467.5 133,509.65
  rectangle net NetQ2_3: 91.15,444.53 133,509.65
  rectangle net NetC14_2: 47.72,418.94 132.49,436.65

## Silkscreen, mask and mechanical layers (free items; w line width, h text height)
Top Overlay:
  lines w5: -322.29,1261.4 -322.29,1275.34 -314.42,1283.21 -293.43,1283.21 ; 343.78,964.91 343.78,955.78 348.59,960.59 343.78,965.41
  text "PROG" at -63.27,1310.2 h40
  text "BATT" at 606.29,1310.76 h40
  text "+" at 561.29,1115.69 h50 r90
  text "-" at 476.29,1105.19 h50
  text "+" at 195.05,719.39 h40 r90
  text "+" at 1,684.65 h40 r90
  text "+" at 396.44,684.73 h40 r90
  text "-" at 190.28,568.53 h40
  text "-" at -9.56,536.55 h40
  text "-" at 387.81,534.62 h40
  text "PWR / MODE" at 42.54,189.78 h50
Bottom Overlay:
  lines w5: -122.62,1088.93 -108.31,1103.24 -31.94,1103.24 -14.4,1120.78 ; -37.32,1087.04 -20.8,1087.04 ; 512.75,1205.28 590.11,1205.28 590.11,1227.76
  text "*" at 770.96,1326.83 h25
  text "LED" at 267.18,1201.83 h60
  text "USB" at -89.83,1200.17 h60
  text "*" at 703.2,1180.31 h25
Dimensions:
  drawing of 13831 lines, arcs and shapes, not listed
  text "Layer" at 1697.2,1272 h60
  text "Name" at 2107.11,1272 h60
  text "Material" at 3036.85,1272 h60
  text "Thickness" at 3896.62,1272 h60
  text "Constant" at 4546.46,1272 h60
  text "Board Layer Stack" at 5116.32,1272 h60
  text "Top Overlay" at 2107.11,1152 h60
  text "Top Solder" at 2107.11,1032 h60
  text "Solder Resist" at 3036.85,1032 h60
  text "0.010mm" at 3896.62,1032 h60
  text "3.5" at 4546.46,1032 h60
  text "1" at 1697.2,912 h60
  text "Top Layer" at 2107.11,912 h60
  text "0.035mm" at 3896.62,912 h60
  text "Dielectric 2" at 2107.11,792 h60
  text "PP-006" at 3036.85,792 h60
  text "0.200mm" at 3896.62,792 h60
  text "4.1" at 4546.46,792 h60
  text "2" at 1697.2,672 h60
  text "GND" at 2107.11,672 h60
  text "CF-004" at 3036.85,672 h60
  text "0.035mm" at 3896.62,672 h60
  text "Dielectric 1" at 2107.11,552 h60
  text "FR-4" at 3036.85,552 h60
  text "1.030mm" at 3896.62,552 h60
  text "4.8" at 4546.46,552 h60
  text "3" at 1697.2,432 h60
  text "POWER" at 2107.11,432 h60
  text "CF-004" at 3036.85,432 h60
  text "0.035mm" at 3896.62,432 h60
  text "Dielectric 3" at 2107.11,312 h60
  text "PP-006" at 3036.85,312 h60
  text "0.200mm" at 3896.62,312 h60
  text "4.1" at 4546.46,312 h60
  text "4" at 1697.2,192 h60
  text "Bottom Layer" at 2107.11,192 h60
  text "0.035mm" at 3896.62,192 h60
  text "Bottom Solder" at 2107.11,72 h60
  text "Solder Resist" at 3036.85,72 h60
  text "0.010mm" at 3896.62,72 h60
  text "3.5" at 4546.46,72 h60
  text "Bottom Overlay" at 2107.11,-48 h60
  text "Total board thickness:" at 1697.2,-168 h60
  text "1.590mm" at 3896.62,-168 h60
Board Shape:
  circle w5: c0,0 r59.06
  circle w5: c177.17,964.57 r59.06
  lines w10: -492.13,1377.95 -213.51,895.38 -118.11,354.33 -118.11,0 -118.11,-118.11 0,-118.11 472.44,-118.11 472.44,354.33 567.84,895.38 846.46,1377.95 -492.13,1377.95
Drill Drawing:
  circle w10: c-417.6,2257.33 r33.33
  lines w10: -450.93,2074 -384.27,2074 -384.27,2140.67 -450.93,2140.67 -450.93,2074
  lines w15: -510.72,2029 9990.37,2029 ; -510.72,2329 9990.37,2329 ; 40.15,1879 40.15,2479 ; 630,1879 630,2479 ; 1699.69,1879 1699.69,2479 ; 2205.56,1879 2205.56,2479 ; 2939.36,1879 2939.36,2479 ; 4438.91,1879 4438.91,2479 ; 5028.76,1879 5028.76,2479 ; 5774.56,1879 5774.56,2479 ; 6424.39,1879 6424.39,2479 ; 7278.15,1879 7278.15,2479 ; 8611.76,1879 8611.76,2479 ; -510.72,1879 9990.37,1879 9990.37,2479 -510.72,2479 -510.72,1879
  text "Symbol" at -420.72,2374 h72
  text "Count" at 85.15,2374 h72
  text "Hole Size" at 675,2374 h72
  text "Plated" at 1744.69,2374 h72
  text "Hole Type" at 2250.56,2374 h72
  text "Drill Layer Pair" at 2984.36,2374 h72
  text "Via/Pad" at 4483.91,2374 h72
  text "Pad Shape" at 5073.76,2374 h72
  text "Template" at 5819.56,2374 h72
  text "Description" at 6469.39,2374 h72
  text "Hole Tolerance (+)" at 7323.15,2374 h72
  text "Hole Tolerance (-)" at 8656.76,2374 h72
  text "35" at 85.15,2224 h60
  text "0.200mm (7.87mil)" at 675,2224 h60
  text "PTH" at 1744.69,2224 h60
  text "Round" at 2250.56,2224 h60
  text "Top Layer - Bottom Layer" at 2984.36,2224 h60
  text "Via" at 4483.91,2224 h60
  text "Rounded" at 5073.76,2224 h60
  text "(Mixed)" at 5819.56,2224 h60
  text "99" at 85.15,2074 h60
  text "0.300mm (11.81mil)" at 675,2074 h60
  text "PTH" at 1744.69,2074 h60
  text "Round" at 2250.56,2074 h60
  text "Top Layer - Bottom Layer" at 2984.36,2074 h60
  text "Via" at 4483.91,2074 h60
  text "Rounded" at 5073.76,2074 h60
  text "(Mixed)" at 5819.56,2074 h60
  text "134 Total" at 85.15,1924 h60

## Dimensions
846.46,1377.95 to 480.89,-121.11 on Dimensions
-492.13,1377.95 to 846.46,1377.95 on Dimensions
472.44,-118.11 to -118.11,-118.11 on Dimensions